# Altium PCB PCB1.PcbDoc
Units mil, origin at the board's own origin, x right, y up, seen from the top; angles counter-clockwise.
Board outline 6000 x 4000 mil, 2 copper layers (Top Layer, Bottom Layer); 3 components, 65 nets, 113 pads, 0 vias.
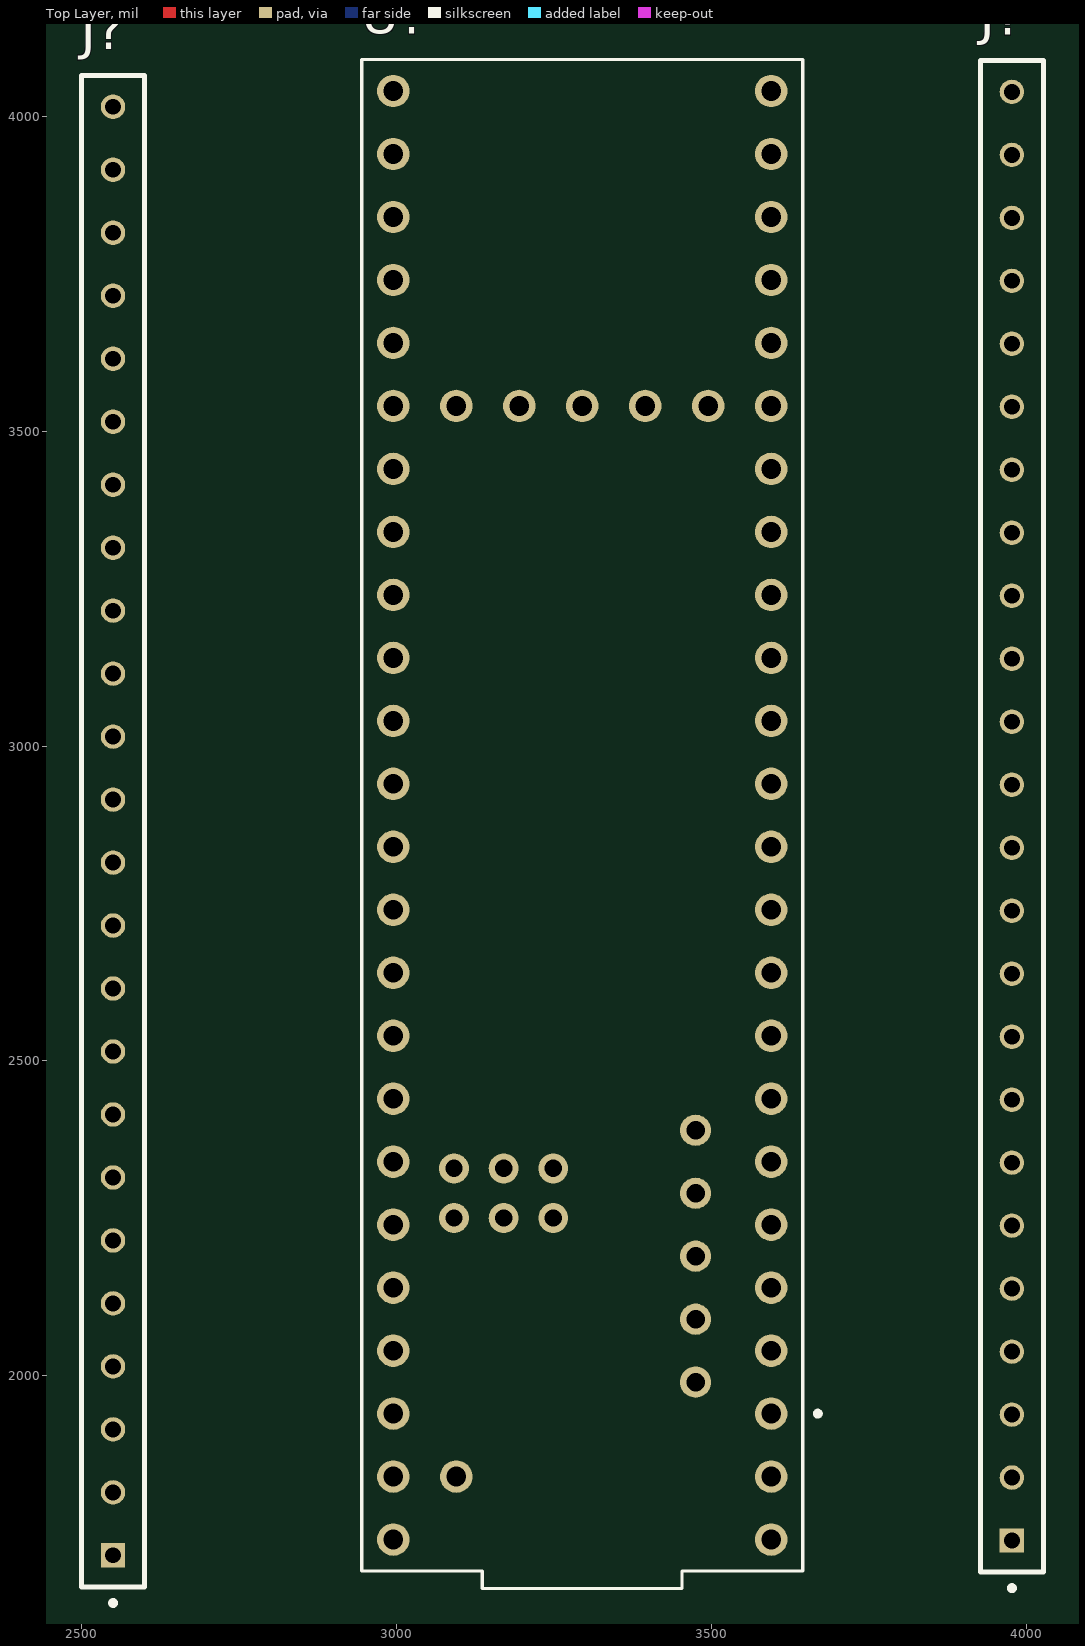
[diagram p0: Top Layer view]
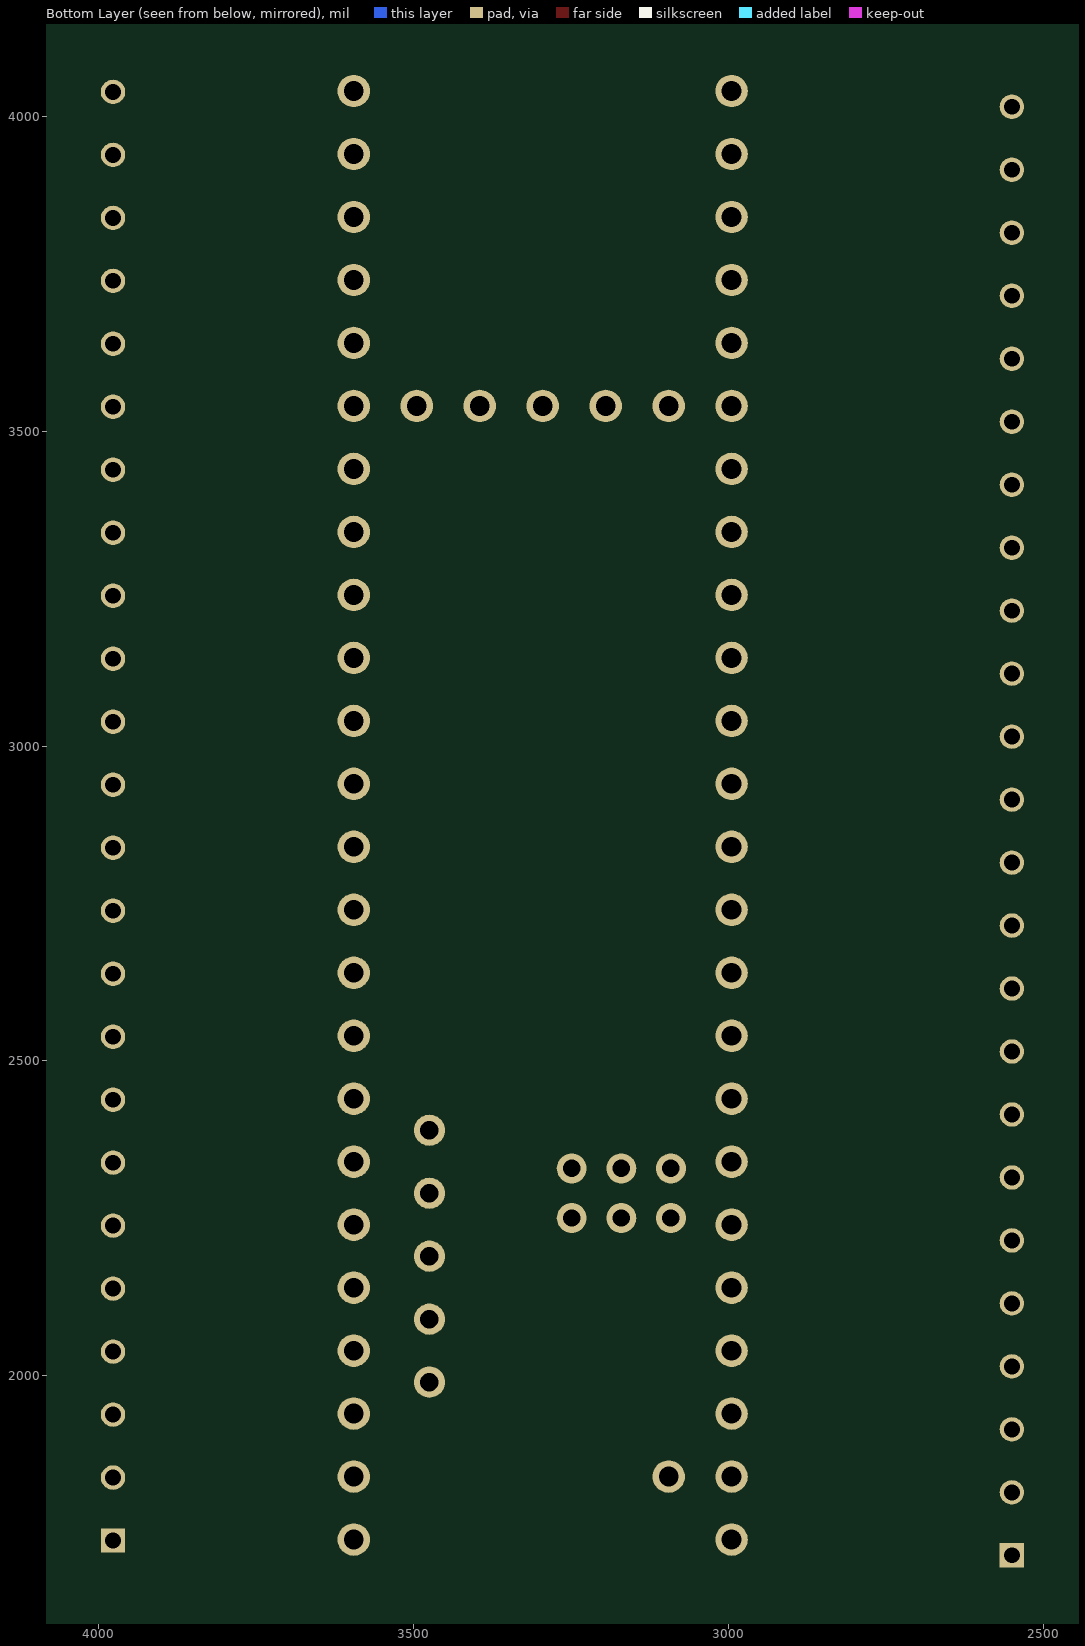
[diagram p1: Bottom Layer view, seen from below]

## Layer stack, top to bottom
Top Solder: solder mask 0.4, Solder Resist, Dk 3.5
Top Layer: signal copper 1.4
Dielectric 1: dielectric 12.6, FR-4, Dk 4.8
Bottom Layer: signal copper 1.4
Bottom Solder: solder mask 0.4, Solder Resist, Dk 3.5

## Board outline
1000,1000 7000,1000 7000,5000 1000,5000

## Design rules (kind name [scope] priority, off if disabled: settings)
Clearance [All] p1: gap=10 ignorepadtopadclearanceinfootprint=FALSE
PolygonConnect [All] p1: connectstyle=Relief reliefconductorwidth=10 reliefentries=4 polygonreliefangle="90 Angle" airgapwidth=10
RoutingVias [All] p1: holewidth=28 width=50 viastyle="Through Hole" minholewidth=28 minwidth=50 maxholewidth=28 maxwidth=50
SolderMaskExpansion [All] p1: expansion=0 istentingtop=FALSE
Width [All] p1: maxlimit=10 minlimit=10 preferedwidth=10
30 further rules are at their usual default settings.

## Classes and differential pairs
component class Sheet1: J? U?

## Components (designator, comment, footprint, x,y, rotation, side; value= is the part's Value field where it differs from the comment)
J? "TS-124-G-AA" SAMTEC_TS-124-G-AA 2550,2865 r90 top
J? "TS-124-G-AA" SAMTEC_TS-124-G-AA 3977.24,2888.56 r90 top
U? "DEV-16771" MODULE_DEV-16771 3295,2890 r90 top

## Footprints (in the part's own frame and the unit in brackets; to place one, negate y for a bottom-side part, rotate by r counter-clockwise, add the part's x,y. Pads: shape width x height; smd on the part's side, far side on the other; paste and mask are expansions set on the pad)
MODULE_DEV-16771 [mm]
  round 1.308 hole 0.8: 0(-26.67,-7.62) 1(-24.13,-7.62) 2(-21.59,-7.62) 3(-19.05,-7.62) 3.3V_1(6.35,-7.62) 3.3V_2(-24.13,7.62) 3.3V_3(16.51,-2.54) 4(-16.51,-7.62) 5(-13.97,-7.62) 6(-11.43,-7.62) 7(-8.89,-7.62) 8(-6.35,-7.62) 9(-3.81,-7.62) 10(-1.27,-7.62) 11(1.27,-7.62) 12(3.81,-7.62) 13(3.81,7.62) 14(1.27,7.62) 15(-1.27,7.62) 16(-3.81,7.62) 17(-6.35,7.62) 18(-8.89,7.62) 19(-11.43,7.62) 20(-13.97,7.62) 21(-16.51,7.62) 22(-19.05,7.62) 23(-21.59,7.62) 24(8.89,-7.62) 25(11.43,-7.62) 26(13.97,-7.62) 27(16.51,-7.62) 28(19.05,-7.62) 29(21.59,-7.62) 30(24.13,-7.62) 31(26.67,-7.62) 32(29.21,-7.62) 33(29.21,7.62) 34(26.67,7.62) 35(24.13,7.62) 36(21.59,7.62) 37(19.05,7.62) 38(16.51,7.62) 39(13.97,7.62) 40(11.43,7.62) 41(8.89,7.62) GND1(-29.21,-7.62) GND2(6.35,7.62) GND3(-26.67,7.62) GND4(16.51,0) ON/OFF(16.51,5.08) PROGRAM(16.51,2.54) VBAT(16.51,-5.08) VIN(-29.21,7.62) VUSB(-26.67,5.08)
  round 1.258 hole 0.75: 5V(-22.86,-4.57) D+(-17.78,-4.57) D-(-20.32,-4.57) USB_GND1(-15.24,-4.57) USB_GND2(-12.7,-4.57)
  round 1.208 hole 0.7: GND5(-14.24,3.17) LED(-16.24,3.17) R+(-16.24,5.17) R-(-14.24,5.17) T+(-14.24,1.17) T-(-16.24,1.17)
  silkscreen extent -31.18,-9.6 30.48,8.89, body extent -31.18,-8.89 30.48,8.89, height 7.15
SAMTEC_TS-124-G-AA [mm]
  rect 0.985x0.985 hole 0.635: 01(-29.21,0)
  round 0.985 hole 0.635: 02(-26.67,0) 03(-24.13,0) 04(-21.59,0) 05(-19.05,0) 06(-16.51,0) 07(-13.97,0) 08(-11.43,0) 09(-8.89,0) 10(-6.35,0) 11(-3.81,0) 12(-1.27,0) 13(1.27,0) 14(3.81,0) 15(6.35,0) 16(8.89,0) 17(11.43,0) 18(13.97,0) 19(16.51,0) 20(19.05,0) 21(21.59,0) 22(24.13,0) 23(26.67,0) 24(29.21,0)
  silkscreen extent -31.23,-1.27 30.48,1.27

## Part data
J? J?: library part CMP-002-00081-1, "CONN HDR .100 24POS", Case/Package=None, Availability="In Stock", Check_prices=https://www.snapeda.com/parts/TS-124-G-AA/Samtec/view-part/?ref=eda, Component Type=Standard, Design Item ID=TS-124-G-AA, MF=Samtec, MP=TS-124-G-AA, Pins=24, Price=None, Purchase-URL=https://pricing.snapeda.com/search/part/TS-124-G-AA/?ref=eda, SnapEDA_Link=https://www.snapeda.com/parts/TS-124-G-AA/Samtec/view-part/?ref=snap, Source=TS-124-G-AA.SchLib
U?: library part CMP-023-000000-1, "RT1062 Teensy 4.1 series ARM® Cortex®-M7 MPU Embedded Evaluation Board", Package=None, Check_prices=https://www.snapeda.com/parts/DEV-16771/SparkFun+Electronics/view-part/?ref=eda, Component Type=Standard, Design Item ID=DEV-16771, MF="SparkFun Electronics", MP=DEV-16771, Pin Count=65, SnapEDA_Link=https://www.snapeda.com/parts/DEV-16771/SparkFun+Electronics/view-part/?ref=snap, Source=DEV-16771.SchLib

## Nets (pads, with @x,y where several pads share a name; then routed paths per layer and width w, separated by ;. In a path a pad name is that pad's centre, name@x,y a point inside that pad or via, vN(x,y) a via of type N, cw(c..) or ccw(c..) an arc to the next point about the centre after c; other vN are vias at no path point)
NetLabel1: U?.VIN
NetLabel2: U?.5
NetLabel3: U?.PROGRAM
NetLabel4: U?.ON/OFF
NetLabel5: U?.0
NetLabel6: U?.1
NetLabel7: U?.7
NetLabel8: U?.8
NetLabel9: U?.28
NetLabel10: U?.29
NetLabel11: U?.34
NetLabel12: U?.35
NetLabel13: U?.30
NetLabel14: U?.31
NetLabel15: U?.3
NetLabel16: U?.4
NetLabel17: U?.33
NetLabel18: U?.13
NetLabel19: U?.14
NetLabel20: U?.15
NetLabel21: U?.16
NetLabel22: U?.17
NetLabel23: U?.18
NetLabel24: U?.19
NetLabel25: U?.20
NetLabel26: U?.21
NetLabel27: U?.22
NetLabel28: U?.USB_GND2
NetLabel29: U?.USB_GND1
NetLabel30: U?.GND5
NetLabel31: U?.GND4
NetLabel32: U?.GND3
NetLabel33: U?.GND2
NetLabel34: U?.GND1
NetLabel35: U?.23
NetLabel37: U?.24
NetLabel38: U?.25
NetLabel39: U?.26
NetLabel40: U?.27
NetLabel41: U?.38
NetLabel42: U?.39
NetLabel43: U?.40
NetLabel44: U?.41
NetLabel54: U?.11
NetLabel55: U?.12
NetLabel56: U?.10
NetLabel57: U?.36
NetLabel58: U?.37
NetLabel59: U?.32
NetLabel60: U?.9
NetLabel61: U?.6
NetLabel62: U?.2
NetLabel63: U?.D-
NetLabel64: U?.D+
NetLabel65: U?.R+
NetLabel66: U?.R-
NetLabel67: U?.T+
NetLabel68: U?.T-
NetLabel69: U?.LED
NetLabel70: U?.VBAT
NetLabel71: U?.VUSB
NetLabel72: U?.3.3V_3
NetLabel73: U?.3.3V_2
NetLabel74: U?.3.3V_1
NetLabel75: U?.5V
pads on no net: J?.01 J?.02 J?.03 J?.04 J?.05 J?.06 J?.07 J?.08 J?.09 J?.10 J?.11 J?.12 J?.13 J?.14 J?.15 J?.16 J?.17 J?.18 J?.19 J?.20 J?.21 J?.22 J?.23 J?.24

## Text inside footprints (layer, text, board x,y; h text height)
U?: Mechanical 13 "Teensy 4.1" at 3281.61,2880.16 h50 r90